# Altium PCB PCB.PcbDoc (part 10 of 10)
Units mm, origin at the board's own origin, x right, y up, seen from the top; angles counter-clockwise.
Board outline 100.5 x 147.95 mm, 6 copper layers (Top Layer, Layer 2 (GND), Layer 3, Layer 4, Layer 5 (AGND), Bottom Layer), stack 1.449 mm thick; 511 components, 297 nets, 1620 pads, 565 vias.
Unrouted connection lines stored in the file: 597.
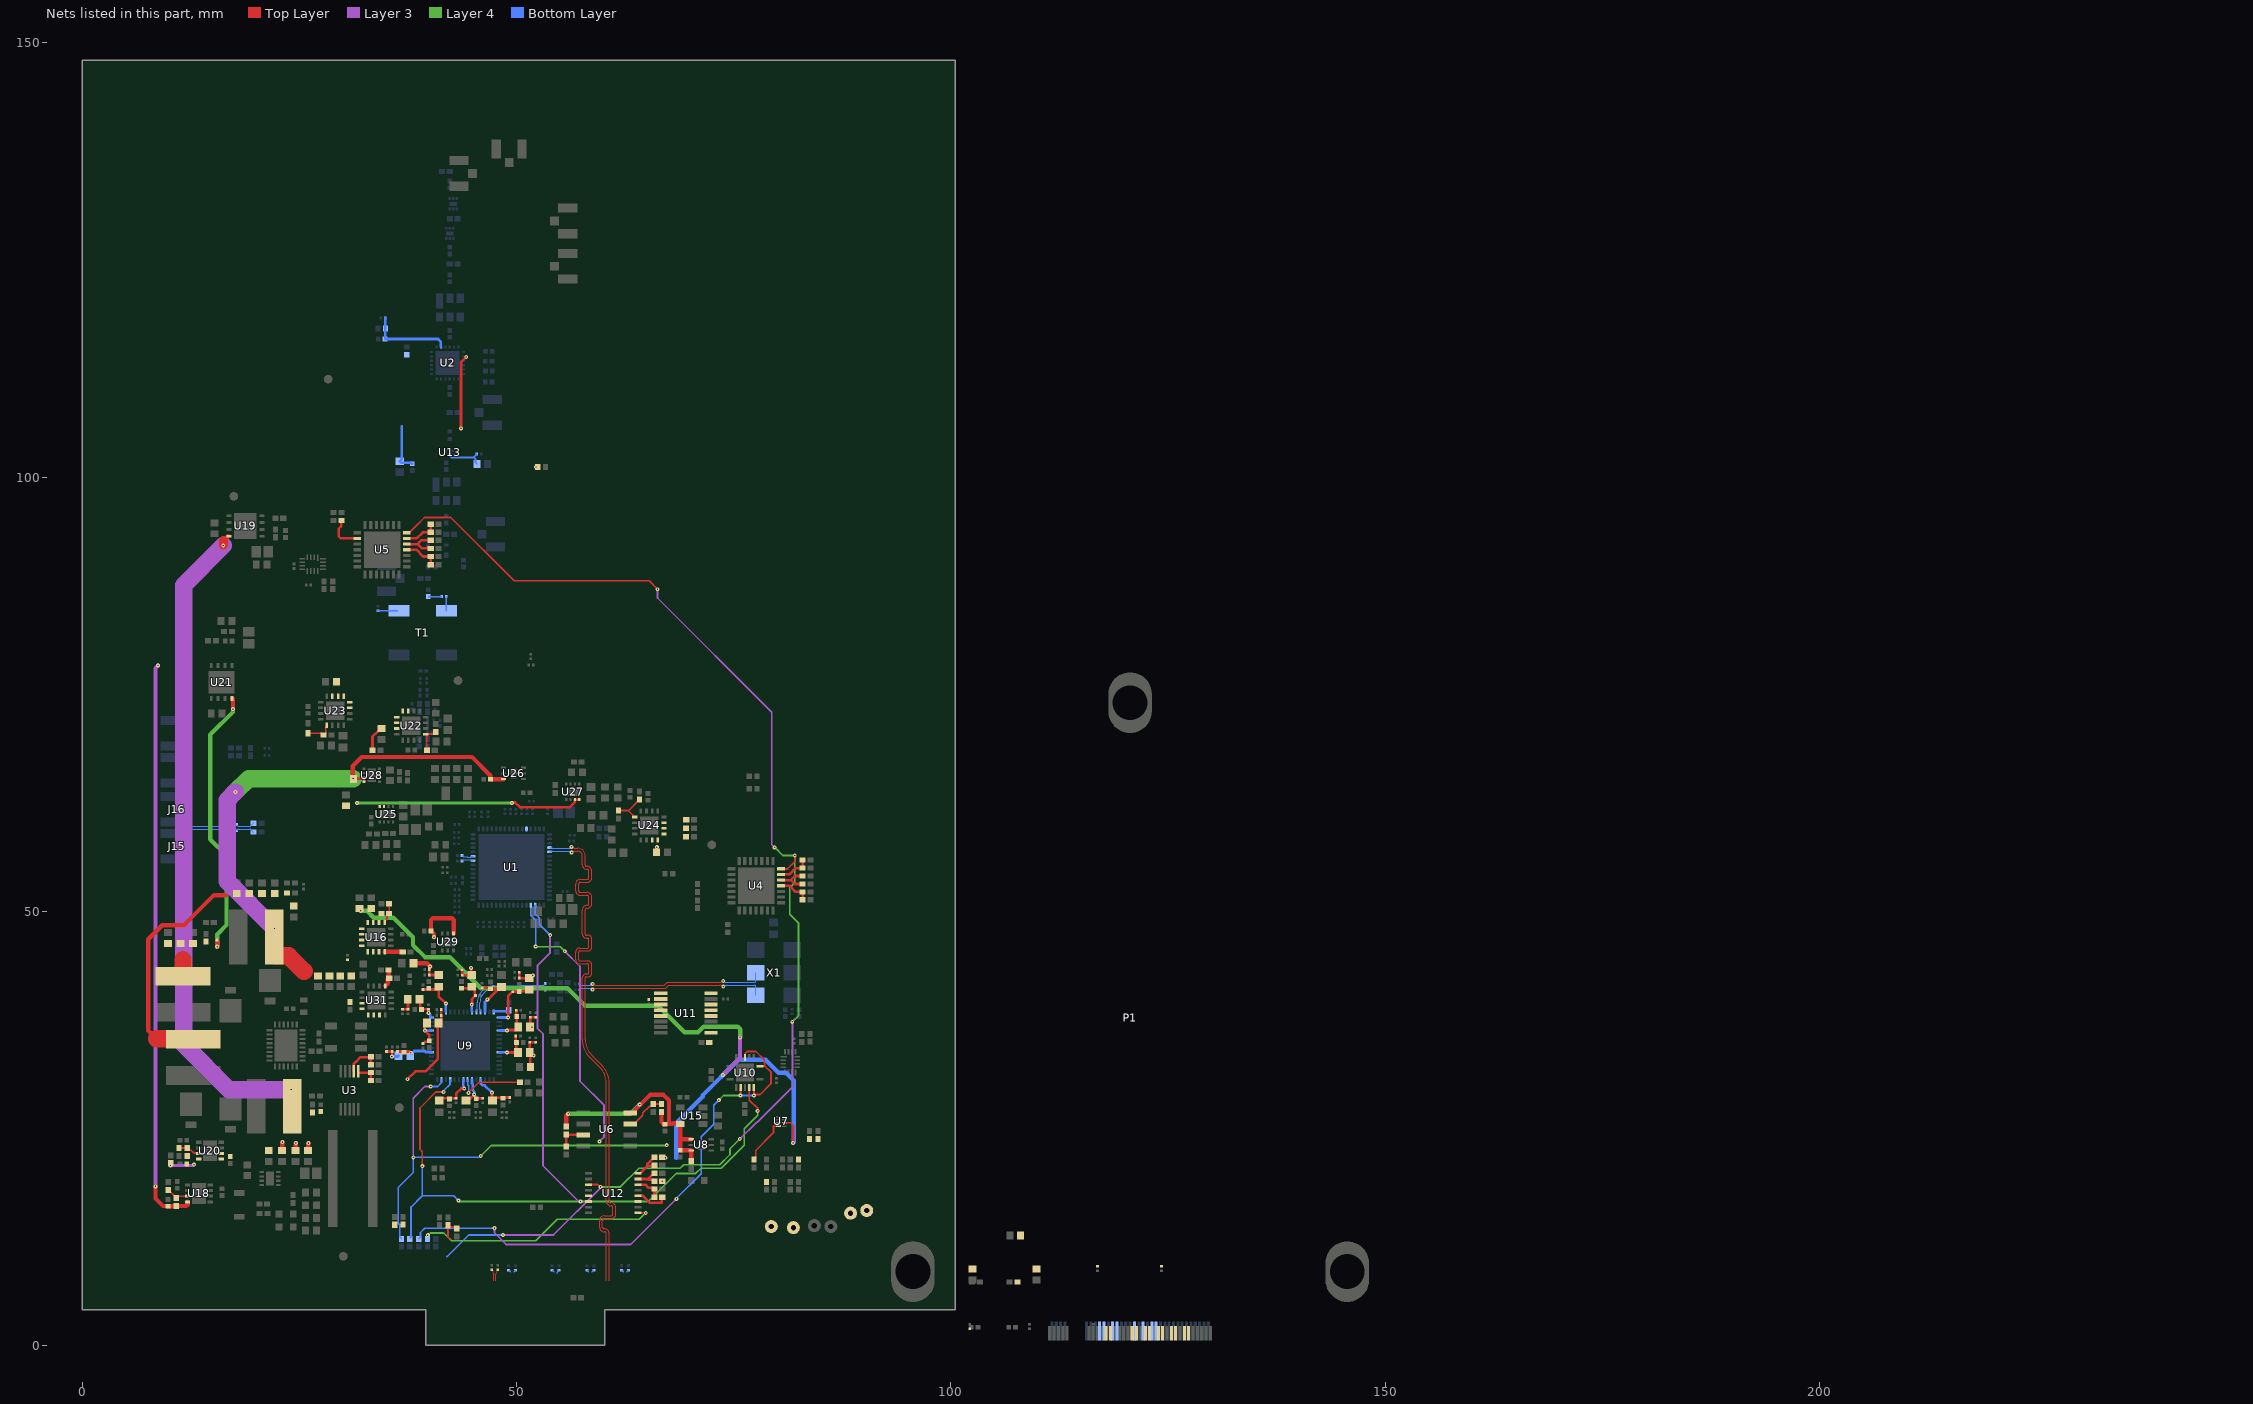
[diagram p7: the nets of this part, all layers, seen from the top]

## Via types
v1: diameter 0.45, hole 0.15, Top Layer to Bottom Layer, 432 vias
v2: diameter 0.5, hole 0.2, Top Layer to Bottom Layer, 132 vias
v3: diameter 0.6, hole 0.2, Top Layer to Bottom Layer, 1 vias

## Nets (pads, with @x,y where several pads share a name; then routed paths per layer and width w, separated by ;. In a path a pad name is that pad's centre, name@x,y a point inside that pad or via, vN(x,y) a via of type N, cw(c..) or ccw(c..) an arc to the next point about the centre after c; other vN are vias at no path point) (continued)
NetR16_1: R16.1 U7.7 U7.8 | length 5.7
  Top Layer w0.2: R16.1@77.316,21.446 77.516,21.646 77.516,22.487 79.562,24.534 79.562,25.325 U7.8@80.151,25.325 U7.7@80.151,25.625
NetR20_2: R20.2 R27.1 U6.7 | length 4.7
  Top Layer w0.2: U6.7@63.077,25.554 63.552,25.554 64.53,26.533 64.53,26.818 65.309,27.597 65.533,27.597 65.733,27.797 R20.2@65.733,27.847 R27.1@66.673,27.847
NetR21_1: R21.1 R119.2 U6.3 | length 3.4
  Top Layer w0.3: R119.2@55.7,22.944 R21.1@55.7,24.356 55.736,24.32 57.641,24.32 U6.3@57.677,24.284
NetR30_2: R30.2 U5.23 | length 4.3
  Top Layer w0.2: R30.2@29.836,95.037 R30.2@29.865,95.066
  Top Layer w0.3: R30.2@29.836,95.037 29.792,94.993 29.792,94.351 29.513,94.072 29.513,93.208 29.763,92.958 U5.23@31.659,92.958
NetR32_2: R32.2 U1.12
NetR50_1: R50.1 R51.2 U16.9 | length 2.4
  Top Layer w0.2: U16.9@34.807,48.726 34.807,48.876 35.08,49.148 35.08,49.574 35.28,49.774 R50.1@35.33,49.774 35.33,50.884 R51.2@35.322,50.892
NetR65_1: R65.1 R66.2 U22.9 | length 3.2
  Top Layer w0.2: R66.2@39.669,68.58 39.639,68.61 39.639,70.329 U22.9@39.539,70.429 40.453,70.429 R65.1@40.694,70.67
NetR67_1: R67.1 R68.2 U23.9 | length 3.2
  Top Layer w0.2: R68.2@25.987,70.518 25.99,70.516 27.59,70.516 R67.1@27.79,70.316 27.84,70.316 28.04,70.516 28.04,71.345 U23.9@28.141,71.446
NetR69_1: R69.1 R70.2 U24.9 | length 4
  Top Layer w0.2: R69.1@61.72,61.629 62.856,61.629 ; U24.9@63.601,60.884 62.856,61.629 ; R70.2@64.133,62.906 64.133,62.856 62.906,61.629 62.856,61.629
NetR77_2: R77.2 U9.42 | length 1.8
  Bottom Layer w0.3: U9.42@47.361,38.452 47.361,38.515 47.391,38.545 49.004,38.545 R77.2@49.096,38.638
NetR78_2: R78.2 U9.7 | length 8
  Top Layer w0.2: v1(44.448,29.124) 45.667,30.343 R78.2@50.366,30.343
  Bottom Layer w0.2: U9.7@44.361,30.652 44.381,30.632 44.381,30.056 44.491,29.946 44.491,29.166 v1(44.448,29.124)
NetR80_1: R80.1 R81.2 U18.7 | length 2.7
  Top Layer w0.2: R81.2@9.884,17.957 9.918,17.957 10.825,17.05 R80.1@10.825,17.034 ; R80.1@10.825,17 R80.1@10.825,17.034 ; U18.7@12.125,17.234 11.025,17.234 R80.1@10.825,17.034
NetR82_1: R82.1 R85.2 U20.7 | length 2.6
  Top Layer w0.2: R85.2@11.137,22.78 R82.1@12.083,22.781 12.083,22.731 12.283,22.531 12.507,22.531 12.82,22.217 13.324,22.217 U20.7@13.399,22.142
NetR86_1: R86.1 R88.2 U31.9 | length 2.1
  Top Layer w0.5: U31.9@34.857,41.441 34.907,41.441 35.179,41.713 35.179,42.282 35.229,42.332 35.279,42.332 35.275,42.335 35.275,43.268 R86.1@35.272,43.272
NetR111_2: R111.2 R129.1 U3.2 | length 4.1
  Top Layer w0.3: U3.2@31.27,31.628 31.27,32.498 31.475,32.703 31.492,32.703 32.028,33.239 33.16,33.239 R129.1@33.21,33.289 R111.2@33.21,32.375
NetR112_2: R112.2 R130.1 U3.1 | length 2.5
  Top Layer w0.3: U3.1@31.77,31.628 31.77,31.461 R130.1@33.21,31.461 R112.2@33.21,30.546
NetR113_1: R113.1 R118.2 U4.12 | length 4.3
  Top Layer w0.3: U4.12@80.42,53.624 81.559,53.624 ; R118.2@82.929,53.178 82.005,53.178 81.559,53.624 ; R113.1@82.929,54.092 82.026,54.092 81.559,53.624
NetR114_1: R114.1 R116.2 U4.13 | length 3.7
  Top Layer w0.3: U4.13@80.42,54.274 81.416,54.274 82.129,54.988 82.91,54.988 R116.2@82.929,55.006 R114.1@82.929,55.921
NetR115_1: R115.1 R117.2 U4.11 | length 3.7
  Top Layer w0.3: U4.11@80.42,52.974 81.426,52.974 82.129,52.272 82.921,52.272 R115.1@82.929,52.263 R117.2@82.929,51.349
NetR120_2: R120.2 R123.1 U5.11 | length 4
  Top Layer w0.3: U5.11@37.359,91.658 38.45,91.658 39.236,90.871 R120.2@40.112,90.871 R123.1@40.112,89.931
NetR121_2: R121.2 R125.1 U5.12 | length 4.7
  Top Layer w0.3: U5.12@37.359,92.308 38.594,92.308 ; R125.1@40.112,91.811 39.091,91.811 38.594,92.308 ; R121.2@40.112,92.751 39.037,92.751 38.594,92.308
NetR122_2: R122.2 R124.1 U5.13 | length 4
  Top Layer w0.3: U5.13@37.359,92.958 38.489,92.958 39.197,93.665 R124.1@40.112,93.665 R122.2@40.112,94.58
NetR138_1: R138.1 R143.2 U12.14 | length 3.1
  Top Layer w0.3: U12.14@63.961,18.567 64.811,18.567 65.178,18.199 65.718,18.199 R143.2@65.868,18.049 R138.1@65.868,17.11
NetR139_1: R139.1 R142.2 U12.15 | length 3.1
  Top Layer w0.3: U12.15@63.961,19.217 65.074,19.217 65.177,19.114 ; R142.2@65.86,19.878 65.81,19.878 65.177,19.245 65.177,19.114 ; R139.1@65.868,18.964 65.718,19.114 65.177,19.114
NetR140_1: R140.1 R141.2 U12.16 | length 3.6
  Top Layer w0.3: U12.16@63.961,19.867 64.211,19.867 65.068,20.724 ; R141.2@65.868,20.793 65.799,20.724 65.068,20.724 ; R140.1@65.868,21.707 65.818,21.707 65.068,20.957 65.068,20.724
NetR145_1: R145.1 U11.9
O1_N: C185.2 U1.59 | length 1.4
  Bottom Layer w0.112: C185.2@43.712,56.454 43.712,56.444 43.863,56.293 44.315,56.293 44.33,56.278 44.693,56.278 44.787,56.372 U1.59@44.987,56.372
O1_P: C183.2 U1.58 | length 1.4
  Bottom Layer w0.112: C183.2@43.712,55.819 43.712,55.829 43.863,55.981 44.186,55.981 44.201,55.966 44.693,55.966 44.787,55.872 U1.58@44.987,55.872
O2_N: C187.2 P1.52 | length 1.3
  Top Layer w0.112: 47.603,7.474 47.603,8.232 cw(c48.331,8.232) 47.816,8.747 C187.2@47.826,8.747
O2_P: C186.2 P1.50 | length 1.3
  Top Layer w0.112: C186.2@47.141,8.747 47.151,8.747 cw(c46.636,8.232) 47.364,8.232 47.364,7.474
O5_N: C228.1 R98.2 | length 2.2
  Bottom Layer w0.112: C228.1@17.79,60.01 17.87,59.931 cw(c17.836,59.897) 17.884,59.897 ccw(c17.932,59.897) 17.898,59.863 ccw(c18.023,59.988) 18.023,59.811 19.302,59.811 ccw(c19.302,59.923) 19.382,59.844 19.4,59.862 ccw(c19.364,59.898) 19.415,59.898 cw(c19.466,59.898) 19.43,59.934 19.623,60.127 cw(c19.709,60.042) R98.2@19.709,60.163
O5_P: C227.1 R97.2 | length 2.2
  Bottom Layer w0.112: C227.1@17.79,59.299 17.87,59.379 ccw(c17.836,59.413) 17.884,59.413 cw(c17.932,59.413) 17.898,59.447 cw(c18.023,59.321) 18.023,59.498 19.302,59.498 cw(c19.302,59.386) 19.382,59.465 19.4,59.447 cw(c19.364,59.411) 19.415,59.411 ccw(c19.466,59.411) 19.43,59.376 19.623,59.182 ccw(c19.709,59.267) R97.2@19.709,59.147
O5P_N: C228.2 J16.2 | length 7.7
  Bottom Layer w0.112: J16.2@11.631,61.788 11.631,59.923 ccw(c11.744,59.923) 11.664,59.844 ccw(c11.744,59.923) 11.744,59.811 17.064,59.811 ccw(c17.064,59.923) 17.144,59.844 17.162,59.863 ccw(c17.129,59.897) 17.177,59.897 cw(c17.224,59.897) 17.191,59.931 C228.2@17.27,60.01
O5P_P: C227.2 J15.2 | length 7.7
  Bottom Layer w0.112: J15.2@11.631,57.521 11.631,59.386 cw(c11.744,59.386) 11.664,59.465 cw(c11.744,59.386) 11.744,59.498 17.064,59.498 cw(c17.064,59.386) 17.144,59.465 17.162,59.447 cw(c17.129,59.413) 17.177,59.413 ccw(c17.224,59.413) 17.191,59.379 C227.2@17.27,59.299
OSCIN_N: C179.2 U9.38 | length 10.1
  Bottom Layer w0.112: U9.38@45.361,38.452 45.361,38.566 cw(c45.521,38.566) 45.408,38.679 ccw(c45.295,38.793) 45.455,38.793 45.455,39.051 45.457,39.052 45.457,39.487 cw(c47.445,39.487) 47.445,41.476 50.515,41.476 cw(c50.554,41.437) 50.554,41.492 53.086,41.492 ccw(c53.086,41.605) 53.165,41.525 53.18,41.539 ccw(c53.135,41.584) 53.198,41.584 cw(c53.262,41.584) 53.217,41.629 C179.2@53.292,41.704
OSCIN_P: C176.2 U9.39 | length 9.7
  Bottom Layer w0.112: U9.39@45.861,38.452 45.861,38.566 ccw(c45.701,38.566) 45.814,38.679 cw(c45.927,38.793) 45.767,38.793 45.767,38.921 45.769,38.923 45.769,39.487 cw(c47.445,39.487) 47.445,41.163 50.663,41.163 cw(c50.702,41.124) 50.702,41.18 53.086,41.18 cw(c53.086,41.067) 53.165,41.147 53.18,41.132 cw(c53.135,41.087) 53.198,41.087 ccw(c53.262,41.087) 53.217,41.043 C176.2@53.292,40.968
PER0_N: C235.2 P1.47 | length 0.3
  Bottom Layer w0.138: 49.646,8.503 cw(c49.784,8.503) 49.687,8.6 49.7,8.614 cw(c49.765,8.549) 49.765,8.64 ccw(c49.765,8.732) C235.2@49.829,8.667 ; C235.2@49.829,8.667 C235.2@49.884,8.722
PER0_P: C236.2 P1.49 | length 0.3
  Bottom Layer w0.138: C236.2@49.071,8.722 49.125,8.667 ccw(c49.19,8.732) 49.19,8.64 cw(c49.19,8.549) 49.255,8.614 49.268,8.6 cw(c49.171,8.503) 49.309,8.503
PER1_N: C233.2 P1.35 | length 0.6
  Bottom Layer w0.138: 54.652,8.282 54.65,8.284 54.65,8.503 cw(c54.788,8.503) 54.69,8.6 54.704,8.614 cw(c54.769,8.549) 54.769,8.64 ccw(c54.769,8.732) C233.2@54.833,8.667 ; C233.2@54.833,8.667 C233.2@54.888,8.722
PER1_P: C234.2 P1.37 | length 0.3
  Bottom Layer w0.138: C234.2@54.075,8.722 54.129,8.667 ccw(c54.194,8.732) 54.194,8.64 cw(c54.194,8.549) 54.259,8.614 54.272,8.6 cw(c54.175,8.503) 54.312,8.503
PER2_N: C17.2 P1.25 | length 0.4
  Bottom Layer w0.138: 58.663,8.484 cw(c58.847,8.484) 58.717,8.614 cw(c58.782,8.549) 58.782,8.64 ccw(c58.782,8.732) C17.2@58.846,8.667 ; C17.2@58.846,8.667 C17.2@58.901,8.722
PER2_P: C18.2 P1.23 | length 0.4
  Bottom Layer w0.138: C18.2@58.088,8.722 58.142,8.667 ccw(c58.207,8.732) 58.207,8.64 cw(c58.207,8.549) 58.272,8.614 cw(c58.142,8.484) 58.326,8.484
PER3_N: C15.2 P1.13 | length 0.4
  Bottom Layer w0.138: 62.651,8.49 cw(c62.835,8.49) 62.705,8.62 cw(c62.77,8.555) 62.77,8.646 ccw(c62.77,8.738) 62.834,8.673 C15.2@62.889,8.728
PER3_P: C16.2 P1.11 | length 0.4
  Bottom Layer w0.138: C16.2@62.076,8.728 62.13,8.673 ccw(c62.195,8.738) 62.195,8.646 cw(c62.195,8.555) 62.26,8.62 cw(c62.13,8.49) 62.313,8.49
PERST#: P1.32 U4.14 U5.14 U12.3 | length 151.1
  Top Layer w0.2: U5.14@37.359,93.608 37.624,93.608 38.454,94.438 38.465,94.438 39.394,95.367 42.416,95.367 49.706,88.077 65.251,88.077 v1(66.216,87.112) ; U12.3@58.261,18.567 59.331,18.567 59.595,18.303 v1(59.663,18.303) ; U4.14@80.42,54.924 80.442,54.902 81.174,54.902 82.015,55.743 v1(82.015,56.454)
  Layer 3 w0.2: v1(48.436,12.766) 54.233,12.766 59.615,18.148 59.615,18.256 v1(59.663,18.303) ; v1(66.216,87.112) 66.216,86.096 79.373,72.939 79.373,57.724 v1(79.703,57.394) ; v1(75.69,23.815) 77.629,25.754 77.711,25.754 81.752,29.795 81.752,37.286 v1(81.735,37.303)
  Layer 4 w0.2: v1(59.663,18.303) 61.949,18.303 64.082,20.437 68.814,20.437 69.237,20.86 73.402,20.86 74.569,22.027 74.569,22.694 v1(75.69,23.815) ; v1(79.703,57.394) 80.643,56.454 v1(82.015,56.454) 82.015,53.316 81.439,52.74 81.439,49.67 82.464,48.645 82.464,38.031 v1(81.735,37.303)
  Bottom Layer w0.2: 41.983,10.276 44.474,12.766 v1(48.436,12.766)
PET1_N: P1.29
PET1_P: P1.31
PET2_N: P1.19
PET2_P: P1.17
PET3_N: P1.46 U1.20 | length 63.6
  Top Layer w0.138: v1(56.335,57.447) cw(c56.335,57.252) 56.473,57.39 ccw(c56.713,57.63) 56.713,57.291 57.047,57.291 cw(c57.047,56.445) 57.892,56.445 57.892,55.396 ccw(c58.096,55.396) 58.096,55.192 ; 58.096,50.381 ccw(c58.096,50.177) 57.892,50.177 57.892,47.422 ccw(c58.022,47.422) 58.022,47.292 58.193,47.292 cw(c58.193,46.825) 58.66,46.825 58.66,45.931 cw(c58.193,45.931) 58.193,45.464 57.253,45.464 ccw(c57.253,45.334) 57.124,45.334 57.124,44.439 ccw(c57.253,44.439) 57.253,44.31 58.193,44.31 cw(c58.193,43.843) 58.66,43.843 58.66,42.948 cw(c58.193,42.948) 58.193,42.481 58.022,42.481 ccw(c58.022,42.352) 57.892,42.352 57.892,35.274 ccw(c60.432,35.274) 58.636,33.478 59.812,32.302 cw(c57.784,30.274) 60.652,30.274 60.652,16.661 ccw(c60.856,16.661) 60.856,16.457 ; 58.119,50.381 ccw(c58.119,50.922) 58.66,50.922 58.66,51.668 ccw(c58.119,51.668) 58.119,52.209 57.328,52.209 cw(c57.328,52.413) 57.124,52.413 57.124,53.159 cw(c57.328,53.159) 57.328,53.363 58.119,53.363 ccw(c58.119,53.905) 58.66,53.905 58.66,54.65 ccw(c58.119,54.65) 58.119,55.192 ; 60.088,13.474 cw(c60.088,13.678) 59.884,13.678 59.884,14.424 cw(c60.088,14.424) 60.088,14.628 60.879,14.628 ccw(c60.879,15.17) 61.42,15.17 61.42,15.915 ccw(c60.879,15.915) 60.879,16.457 ; 60.11,13.474 cw(c60.11,12.933) 60.652,12.933 60.652,7.507
  Bottom Layer w0.138: U1.20@53.787,57.372 53.924,57.372 cw(c53.924,57.233) 54.022,57.331 ccw(c54.12,57.429) 54.12,57.291 56.292,57.291 ccw(c56.292,57.334) 56.323,57.304 ccw(c56.292,57.334) 56.335,57.334 v1(56.335,57.447)
PET3_P: P1.44 U1.21 | length 63
  Top Layer w0.138: v1(56.335,56.797) ccw(c56.335,56.992) 56.473,56.854 cw(c56.713,56.614) 56.713,56.953 57.047,56.953 cw(c57.047,56.445) 57.555,56.445 57.555,55.396 ccw(c58.096,55.396) 58.096,54.854 ; 58.096,50.718 ccw(c58.096,50.177) 57.555,50.177 57.555,47.422 ccw(c58.022,47.422) 58.022,46.955 58.193,46.955 cw(c58.193,46.825) 58.323,46.825 58.323,45.931 cw(c58.193,45.931) 58.193,45.801 57.253,45.801 ccw(c57.253,45.334) 56.786,45.334 56.786,44.439 ccw(c57.253,44.439) 57.253,43.972 58.193,43.972 cw(c58.193,43.843) 58.323,43.843 58.323,42.948 cw(c58.193,42.948) 58.193,42.819 58.022,42.819 ccw(c58.022,42.352) 57.555,42.352 57.555,35.273 ccw(c60.429,35.273) 58.397,33.24 59.571,32.066 cw(c57.774,30.27) 60.314,30.27 60.314,16.661 ccw(c60.856,16.661) 60.856,16.119 ; 58.119,50.718 ccw(c58.119,50.922) 58.323,50.922 58.323,51.668 ccw(c58.119,51.668) 58.119,51.872 57.328,51.872 cw(c57.328,52.413) 56.786,52.413 56.786,53.159 cw(c57.328,53.159) 57.328,53.701 58.119,53.701 ccw(c58.119,53.905) 58.323,53.905 58.323,54.65 ccw(c58.119,54.65) 58.119,54.854 ; 60.088,13.137 cw(c60.088,13.678) 59.546,13.678 59.546,14.424 cw(c60.088,14.424) 60.088,14.966 60.879,14.966 ccw(c60.879,15.17) 61.083,15.17 61.083,15.915 ccw(c60.879,15.915) 60.879,16.119 ; 60.11,13.137 cw(c60.11,12.933) 60.314,12.933 60.314,7.507
  Bottom Layer w0.138: U1.21@53.787,56.872 53.924,56.872 ccw(c53.924,57.011) 54.022,56.913 cw(c54.12,56.815) 54.12,56.953 56.292,56.953 cw(c56.292,56.91) 56.323,56.941 cw(c56.292,56.91) 56.335,56.91 v1(56.335,56.797)
SC18_INT: R28.1 R105.2 U12.9 | length 27.8
  Top Layer w0.2: U12.9@63.961,15.317 63.966,15.312 64.864,15.312 v1(64.87,15.306)
  Layer 4 w0.2: v1(39.775,12.741) 39.797,12.741 40.051,12.995 41.623,12.995 42.529,12.089 52.194,12.089 54.675,14.57 63.879,14.57 64.133,14.57 v1(64.87,15.306)
SMCLK: P1.26 R47.1
SMDAT: P1.28 R45.1 | length 0.2
  Top Layer w0.2: R45.1@36.904,13.953 R45.1@37.04,13.817
SPI_CLK: R36.2 U1.36 U9.13 U11.14 | length 83.4
  Layer 3 w0.2: v1(38.098,21.707) 38.098,28.52 39.439,29.86 v1(40.105,29.86) ; v1(55.548,45.431) 57.301,43.678 57.301,30.46 60.069,27.692 60.069,24.069 v1(59.536,23.536)
  Layer 4 w0.2: v1(45.871,21.859) 47.073,23.062 67.24,23.062 v1(67.283,23.104) ; v1(52.195,45.989) 52.225,45.96 55.019,45.96 v1(55.548,45.431)
  Bottom Layer w0.2: R36.2@36.752,12.327 36.552,12.527 36.552,13.926 36.379,14.099 36.379,18.236 38.098,19.954 v1(38.098,21.707) 45.651,21.707 45.803,21.859 v1(45.871,21.859) ; v1(40.105,29.86) 40.913,29.86 41.341,30.288 41.341,30.632 U9.13@41.361,30.652 ; 51.618,50.392 51.618,49.578 52.195,49.001 v1(52.195,45.989)
SPI_CLK_SCI: TP4.1 U11.3 U12.11
SPI_MISO: R104.2 TP3.1 U10.3 U10.6 U10.8 U10.11 U11.12 | length 62.5
  Top Layer w0.2: v1(75.766,28.819) 75.779,28.832 75.779,29.722 U10.3@75.792,29.735 ; U10.11@76.292,33.185 76.332,33.225 76.332,33.689 76.527,33.885 77.556,33.885 78.52,32.921 78.52,32.597 78.57,32.546 78.57,32.223 ; U10.6@77.292,29.735 77.332,29.695 77.332,29.057 v1@77.443,28.946 ; v1(77.316,28.819) v1@77.443,28.946 ; U10.8@78.017,32.21 78.029,32.223 78.57,32.223 ; v1@77.443,28.946 78.027,28.946 79.297,30.216 79.297,31.496 78.57,32.223
  Layer 3 w0.2: v1(47.445,13.554) 47.445,13.014 48.786,11.674 63.143,11.674 v1(68.4,16.932)
  Layer 4 w0.2: v1(73.277,28.286) 73.811,28.819 v1(75.766,28.819)
  Bottom Layer w0.2: R104.2@38.733,12.327 38.933,12.527 38.933,13.053 39.434,13.554 v1(47.445,13.554) ; v1(68.4,16.932) 68.4,16.983 71.245,19.827 71.245,24.069 72.693,25.517 72.693,27.701 v1(73.277,28.286) ; v1(75.766,28.819) v1(77.316,28.819)
SPI_MISO_SCI: TP6.1 U11.5 U12.5
SPI_MOSI: R48.2 U1.35 U9.11 U10.5 U11.13 | length 106.3
  Top Layer w0.2: v1(39.14,20.691) 39.14,22.362 38.869,22.633 38.869,27.384 40.71,29.225 v1(41.603,29.225) ; v1(57.351,16.627) v1@57.356,16.622 ; U10.5@76.791,29.734 76.791,28.296 77.748,27.339 v1(77.748,27.041)
  Layer 3 w0.2: v1(53.872,47.285) 53.855,47.268 53.855,45.237 52.39,43.773 52.39,36.577 53.042,35.925 53.042,20.728 57.142,16.627 v1(57.351,16.627)
  Layer 4 w0.2: v1(43.305,16.729) 43.407,16.627 v1(57.351,16.627) 65.173,16.627 68.399,19.853 70.629,19.853 71.231,20.454 73.561,20.454 76.215,23.108 76.215,25.001 77.748,26.533 v1(77.748,27.041)
  Bottom Layer w0.2: R48.2@37.692,12.377 37.853,12.538 37.853,15.991 39.14,17.278 ; v1(39.14,20.691) 39.14,17.278 ; v1(41.603,29.225) 41.603,29.403 42.341,30.141 42.341,30.632 U9.11@42.361,30.652 ; v1(43.305,16.729) 42.756,17.278 39.14,17.278 ; U1.35@52.137,50.722 52.118,50.703 52.118,50.211 52.102,50.195 52.102,49.76 52.595,49.267 52.595,48.561 v1(53.872,47.285)
SPI_MOSI_SCI: TP5.1 U11.4 U12.6
Tor_RF_50: C19.1 C32.1 | length 1.6
  Bottom Layer w0.165: C32.1@39.808,86.271 C19.1@41.388,86.271
TorRF_50: C19.2 T1.1 | length 1.6
  Bottom Layer w0.165: T1.1@41.908,84.632 C19.2@41.908,86.271
TorRF_50_1: C20.2 T1.4 | length 2.4
  Bottom Layer w0.165: C20.2@33.956,84.632 T1.4@36.337,84.632
V2.5: C45.2 C46.2 C47.2 C48.2 C55.2 C112.2 C131.2 L3.2 R52.2 U25.7 U25.8 U27.7 U27.8 | length 53.5
  Top Layer w0.3: v1(49.477,62.499) 49.528,62.55 49.833,62.55 50.366,62.017 56.129,62.017 56.687,62.575 56.687,62.87 U27.7@56.712,62.895 U27.8@57.212,62.895
  Top Layer w0.5: 8.54,35.36 7.597,36.303 7.597,46.803 9.21,48.416 11.692,48.416 12.351,49.075 15.17,51.894 16.517,51.894
  Top Layer w2: 8.54,35.36 12.694,35.36 L3.2@12.769,35.285
  Layer 4 w0.3: v1(31.621,62.499) v1(49.477,62.499)
V3.6: C38.2 R102.2 U16.1 U16.2 U16.3 U16.4 U16.15 U16.16 | length 2.1
  Top Layer w0.5: U16.4@34.807,45.376 34.818,45.365 36.875,45.365 R102.2@36.886,45.354
V3.7: C51.2 C52.2 C53.2 C94.2 C147.2 C168.2 C245.2 L5.2 R?.2@107.655,7.35 U26.6 U28.7 U28.8 U29.1 | length 67.7
  Top Layer w0.3: C147.2@31.228,65.279 32.267,65.279 ; U28.8@32.433,64.945 32.433,65.279 32.267,65.279 ; U28.7@32.433,65.445 32.267,65.279
  Top Layer w0.5: C147.2@31.228,65.279 31.139,65.369 31.139,66.767 32.167,67.795 44.852,67.795 46.972,65.675 46.972,65.269 46.992,65.249 C94.2@46.997,65.249 U26.6@48.494,65.249 ; v1(40.486,47.056) 40.486,47.403 40.13,47.758 C168.2@40.139,47.767 40.139,49.021 40.333,49.215 42.579,49.215 42.761,49.033 42.761,47.497 U29.1@42.736,47.472
  Top Layer w2: L5.2@22.105,47.067 22.105,44.992 22.18,44.917 23.756,44.917 24.075,44.598 24.075,44.561 25.492,43.144 25.529,43.144
  Layer 3 w2: v1(17.626,63.769) 16.686,62.83 16.686,53.481 v1(22.126,48.041)
  Layer 4 w2: v1(17.626,63.769) 19.165,65.309 v1(31.198,65.309)
V5.5: C61.2 C62.2 C63.2 C64.2 C65.2 C69.2 C247.2 L7.2 R59.1 U19.4 U20.1 U20.2 | length 78
  Top Layer w0.3: v1(16.229,92.141) v1@16.258,92.17 ; U19.4@16.726,93.191 U19.4@16.876,93.191
  Top Layer w0.5: 16.258,92.723 U19.4@16.726,93.191 ; C64.2@22.976,22.494 23.036,22.554 v1(23.036,23.46) ; C63.2@24.539,22.494 24.585,22.541 v1(24.585,23.358) ; C62.2@25.979,22.494 26.008,22.523 26.008,23.307 v1(26.033,23.333)
  Top Layer w1: v1@16.258,92.17 16.258,92.723
  Layer 3 w2: v1(16.229,92.141) 11.657,87.569 11.657,34.737 16.889,29.505 v1(24.052,29.505)
V_LMK_1.8V: C158.2 C159.2 C162.2 C163.2 C181.2 C182.2 C191.2 C192.2 C199.2 C200.2 C203.2 C204.2 C211.2 C212.2 C215.2 C216.2 C220.2 FB17.1 FB18.1 FB20.1 FB22.1 FB24.1 FB25.1 FB27.1 FB28.1 FB30.2 | length 28.4
  Top Layer w0.3: C181.2@35.025,33.893 C182.2@35.675,33.893 ; v1(35.634,33.315) 35.663,33.344 35.663,33.871 35.675,33.883 C182.2@35.675,33.893 ; C182.2@35.685,33.893 C182.2@35.675,33.893 ; C211.2@36.854,38.75 36.864,38.75 36.87,38.756 C212.2@37.489,38.756 37.489,39.879 FB27.1@37.474,39.893 37.387,39.98 37.514,40.107 FB27.1@37.514,40.097 ; v1(37.438,30.699) 38.34,31.6 39.533,31.6 40.911,32.978 40.911,37.064 FB24.1@41.023,37.176 41.323,37.476 41.323,38.016 41.336,38.029 C200.2@41.336,38.039 C199.2@41.336,38.725 ; v1@40.054,43.663 39.96,43.569 C159.2@39.96,43.339 C158.2@39.96,42.703 FB17.1@41.032,42.703 ; C216.2@43.735,43.311 C215.2@43.735,42.663 44.785,42.663 FB28.1@44.825,42.703 44.753,42.774 v1(44.753,43.526) ; C163.2@50.299,43.018 C162.2@50.299,42.343 FB18.1@51.471,42.343 ; FB22.1@51.539,36.718 51.56,36.74 C192.2@51.56,37.855 52.166,37.855 52.185,37.836 C191.2@52.195,37.836 ; C220.2@51.586,32.121 51.586,33.71 FB25.1@51.518,33.778 C203.2@51.518,34.934 C204.2@52.193,34.934
  Top Layer w0.5: FB30.2@38.124,44.059 39.667,44.059 40.04,43.686 40.04,43.677 v1@40.054,43.663
  Bottom Layer w0.3: v1(35.634,33.315) 36.295,33.315 FB20.1@36.396,33.416
  other v1: 51.967,33.442 51.763,36.693 51.865,42.662 40.029,43.678
VCC: C34.2 C50.2 C237.2 R21.2 R27.2 R132.2 U6.8 U8.4 U8.6 U15.5 | length 28.6
  Top Layer w0.5: R21.2@55.7,25.256 55.7,26.482 v1(55.929,26.711) ; U6.8@63.077,26.824 63.282,26.824 65.352,28.895 66.911,28.895 67.536,28.27 67.536,25.72 ; R27.2@66.623,26.897 R27.2@66.673,26.947 66.673,25.771 C34.2@66.918,25.526 ; C34.2@67.08,25.526 67.08,25.531 67.1,25.551 67.886,25.551 67.969,25.634 68.735,25.634 U15.5@68.841,25.527 ; U15.5@68.848,25.534 U15.5@68.841,25.527 ; U8.4@70.095,23.779 70.087,23.788 69.045,23.788 68.84,23.993 ; R132.2@70.102,21.293 70.102,22.472 U8.6@70.095,22.479 70.071,22.504 68.852,22.504 68.832,22.524 C237.2@68.832,22.529 68.84,22.537 68.84,23.993 ; 68.84,23.993 68.84,25.526 U15.5@68.841,25.527
  Layer 4 w0.5: v1(55.929,26.711) 63.092,26.711 v1(64.159,27.778)
VCC_2.8_LNA: C26.2 C27.2 FB1.2 U13.2 | length 4.5
  Bottom Layer w0.2: U13.2@42.3,102.659 42.325,102.634 42.325,102.431 42.472,102.284 45.051,102.284 ; C26.2@45.412,101.52 45.272,101.66 45.272,102.063 45.051,102.284 ; C27.2@45.418,102.662 45.418,102.652 45.051,102.284
  other v1: 52.233,101.183
VCC_5_ATT: C9.2 C10.2 FB2.2 U2.2 | length 9.6
  Bottom Layer w0.3: C9.2@34.856,118.336 34.856,115.913 C10.2@34.858,115.911 40.954,115.911 41.275,115.59 41.275,115.005 U2.2@41.3,114.98
VCC_AMP_5: C30.2 FB3.2 R46.2 | length 14.1
  Top Layer w0.3: v1(43.597,105.628) 43.597,113.247 v1(44.2,113.85)
  Bottom Layer w0.3: 36.763,105.878 36.763,102.062 R46.2@36.556,101.855 36.741,101.669 37.853,101.669 37.973,101.549 C30.2@37.973,101.544
VCC_PCA: C35.2 C36.2 C243.1 C251.1 R19.2 R50.2 R126.2 R138.2 R139.2 R140.2 U7.2 U11.1 U11.2 U11.16 U12.12 U16.10 U16.11 U16.12 U16.13 U16.14 | length 92.3
  Top Layer w0.2: U7.2@80.821,25.675 81.552,25.675 81.913,25.314
  Top Layer w0.3: U12.12@63.961,17.267 64.565,17.267 65.373,16.46 66.726,16.46 66.726,17.068 R138.2@66.768,17.11 ; v1(81.837,23.358) 81.837,25.238
  Layer 3 w0.5: v1(73.76,31.181) 75.716,33.137 v1(75.716,35.525)
  Layer 4 w0.5: v1(32.053,50.079) 32.764,50.079 33.552,49.291 35.812,49.291 38.073,47.031 38.073,46.127 39.444,44.756 42.289,44.756 45.881,41.163 55.853,41.163 57.86,39.156 66.278,39.156 69.34,36.094 70.888,36.094 71.552,36.758 75.448,36.758 75.741,36.466 75.741,35.55 v1(75.716,35.525)
  Bottom Layer w0.5: 68.375,21.631 68.375,25.633 71.412,28.671 71.412,28.834 75.512,32.934 78.662,32.934 80.148,31.448 81.001,31.448 81.902,30.546 81.902,23.423 v1(81.837,23.358)
  other v1: 66.768,18.964 67.13,21.656
VCXO_OUT_N: C178.1 X1.5 | length 21.8
  Top Layer w0.138: v1(58.748,41.657) 58.829,41.657 58.985,41.501 67.003,41.501 67.347,41.845 73.408,41.845 ccw(c73.408,42.184) 73.648,41.944 cw(c73.785,41.806) v1(73.785,42.001)
  Bottom Layer w0.138: C178.1@57.283,41.67 57.283,41.66 57.435,41.508 57.881,41.508 57.888,41.501 58.512,41.501 58.668,41.657 v1(58.748,41.657) ; v1(73.785,42.001) cw(c73.785,41.806) 73.923,41.944 73.944,41.923 ccw(c74.133,42.111) 74.133,41.845 77.398,41.845 ccw(c77.398,41.982) 77.495,41.885 ccw(c77.398,41.982) 77.535,41.982 X1.5@77.535,42.976
VCXO_OUT_P: C175.1 X1.4 | length 21.8
  Top Layer w0.138: v1(58.748,41.007) 58.829,41.007 58.985,41.163 67.143,41.163 67.487,41.507 73.408,41.507 cw(c73.408,41.168) 73.648,41.408 ccw(c73.785,41.546) v1(73.785,41.351)
  Bottom Layer w0.138: C175.1@57.283,41.008 57.283,41.018 57.435,41.17 57.741,41.17 57.748,41.163 58.512,41.163 58.668,41.007 v1(58.748,41.007) ; v1(73.785,41.351) ccw(c73.785,41.546) 73.923,41.408 73.944,41.429 cw(c74.133,41.241) 74.133,41.507 77.398,41.507 cw(c77.398,41.37) 77.495,41.467 cw(c77.398,41.37) 77.535,41.37 X1.4@77.535,40.376
VDD_CORE: C152.2 C153.2 FB15.2 U9.8 | length 4.8
  Top Layer w0.3: FB15.2@41.106,28.247 41.366,28.507 C152.2@43.027,28.507 43.034,28.507 43.034,29.036 43.63,29.632 v1(43.966,29.632)
  Bottom Layer w0.3: U9.8@43.861,30.652 43.863,30.651 43.863,29.735 v1(43.966,29.632)
VDD_IO: C160.2 C161.2 FB17.2 U9.31 | length 5.1
  Top Layer w0.3: C160.2@39.207,41.024 FB17.2@41.032,41.024 ; FB17.2@41.032,41.353 FB17.2@41.032,41.024 ; v1(41.857,39.411) 41.032,40.237 FB17.2@41.032,41.024
  Bottom Layer w0.3: v1(41.857,39.411) 41.859,39.409 41.859,38.454 U9.31@41.861,38.452
VDD_OSC: C217.2 C218.2 FB28.2 U9.37 | length 4.6
  Top Layer w0.3: C218.2@43.65,41.163 44.635,41.163 FB28.2@44.825,41.353 44.875,41.353 45.175,41.053 45.175,40.421 45.261,40.335 C217.2@45.261,40.325 45.261,40.315 44.858,39.912 44.858,39.313 v1(44.829,39.284)
  Bottom Layer w0.3: v1(44.829,39.284) 44.829,39.182 44.831,39.18 44.831,38.482 U9.37@44.861,38.452
VDD_PLL1: C156.2 C157.2 FB16.2 U9.40 | length 5.8
  Top Layer w0.3: C156.2@46.01,41.248 46.869,41.248 46.994,41.124 C157.2@46.994,41.119 FB16.2@47.983,41.119 ; v1(46.633,39.893) 46.661,39.922 46.786,39.922 FB16.2@47.983,41.119 ; FB16.2@48.248,41.334 48.033,41.119 FB16.2@47.983,41.119
  Bottom Layer w0.3: U9.40@46.361,38.452 46.361,39.581 46.633,39.853 v1(46.633,39.893)
VDD_PLL2CORE: C174.2 C180.2 FB19.2 U9.6 | length 4.4
  Top Layer w0.3: FB19.2@44.172,28.247 44.394,28.469 44.683,28.469 45.109,28.895 v1(45.109,28.946) 45.109,28.905 45.224,28.79 45.224,28.567 C180.2@45.344,28.447 45.404,28.507 C174.2@46.091,28.507
  Bottom Layer w0.3: U9.6@44.861,30.652 44.861,30.212 44.941,30.133 44.941,29.445 45.109,29.277 v1(45.109,28.946)
VDD_PLL2OSC: C197.2 C198.2 FB23.2 U9.4 | length 5.2
  Top Layer w0.3: v1(47.166,29.149) 47.166,28.306 FB23.2@47.225,28.247 47.525,28.547 48.263,28.547 48.307,28.59 C197.2@49.198,28.59
  Bottom Layer w0.3: U9.4@45.861,30.652 45.891,30.622 45.891,30.207 46.096,30.002 46.313,30.002 v1(47.166,29.149)
VDDO_1/2: C184.2 C190.2 FB20.2 U9.20 | length 4.1
  Top Layer w0.3: C184.2@36.295,33.887 37.638,33.887 37.778,33.747 v1(37.819,33.747)
  Bottom Layer w0.3: FB20.2@37.923,33.643 38.232,33.952 39.429,33.952 39.549,33.832 40.181,33.832 U9.20@40.211,33.802
VDDO_3/4: C201.2 C202.2 FB24.2 U9.25 | length 3.8
  Top Layer w0.3: C201.2@39.216,34.813 39.226,34.813 39.424,35.011 C202.2@39.832,35.011 ; FB24.2@39.673,37.176 39.444,36.947 v1(39.444,36.287) 39.922,35.809 39.922,35.167 C202.2@39.952,35.136
  Bottom Layer w0.3: v1(39.444,36.287) 39.452,36.295 40.203,36.295 U9.25@40.211,36.302
VDDO_5: C213.2 C214.2 FB27.2 U9.28 | length 3.3
  Top Layer w0.3: FB27.2@38.824,39.893 38.892,39.893 38.892,38.88 38.922,38.85 38.922,38.845 39.042,38.725 39.055,38.738 C213.2@39.851,38.738 v1(39.851,38.344)
  Bottom Layer w0.3: v1(39.851,38.344) 39.851,38.303 40.061,38.093 40.061,37.832 40.091,37.802 U9.28@40.211,37.802
VDDO_6: C164.2 C165.2 FB18.2 U9.43 | length 6.2
  Top Layer w0.3: v1(49.02,37.811) 49.02,40.264 49.535,40.779 49.535,40.789 C164.2@49.545,40.789 50.275,40.789 C165.2@50.299,40.812 51.29,40.812 FB18.2@51.471,40.993
  Bottom Layer w0.3: U9.43@48.011,37.802 48.015,37.807 49.016,37.807 v1(49.02,37.811)
VDDO_7/8: C193.2 C194.2 FB22.2 U9.46 | length 4.4
  Top Layer w0.3: v1(48.893,36.312) 48.934,36.312 48.99,36.368 49.889,36.368 50.189,36.668 FB22.2@50.189,36.718 50.002,36.905 C194.2@50.002,37.912 49.96,37.954 C193.2@49.96,38.649
  Bottom Layer w0.3: U9.46@48.011,36.302 48.016,36.307 48.888,36.307 v1(48.893,36.312)
VDDO_9/10: C205.2 C206.2 FB25.2 U9.51 | length 4.2
  Top Layer w0.3: v1(48.893,33.772) 50.162,33.772 FB25.2@50.168,33.778 49.978,33.968 C206.2@49.978,34.936 49.921,34.993 C205.2@49.921,35.669
  Bottom Layer w0.3: U9.51@48.011,33.802 48.026,33.787 48.878,33.787 v1(48.893,33.772)
VP3.3: C56.2 C57.2 C58.2 C246.2 C?.2@108.03,12.701 L6.2 R56.2 R109.2 U31.1 U31.2 U31.3 U31.15 U31.16 | length 33.5
  Top Layer w0.5: 15.5,46.592 15.52,46.572 15.52,45.969 v1(15.523,45.965) ; 17.226,74.519 17.276,74.519 17.326,74.469 17.326,74.419 17.346,74.399 v1(17.346,73.303)
  Top Layer w2: L6.2@11.593,42.552 11.593,44.465
  Layer 4 w0.5: v1(15.523,45.965) 15.523,47.365 16.605,48.446 16.605,56.446 14.739,58.312 14.739,70.369 17.346,72.975 v1(17.346,73.303)
VP3.6: C248.2 U21.4
Vsup_ADC1: C60.2 C80.2 C81.2 R80.2 R103.1 R107.2 R108.2 U18.8 U23.1 U23.2 U23.3 U23.15 U23.16 U24.1 U24.2 U24.3 U24.15 U24.16 | length 66.2
  Top Layer w0.5: v1(8.422,18.364) 8.422,16.959 9.28,16.101 9.845,16.101 9.865,16.081 C60.2@9.865,16.076 9.877,16.088 10.813,16.088 R80.2@10.825,16.1 11.966,16.1 12.125,16.259 U18.8@12.125,16.584 ; C81.2@65.959,56.985 C81.2@66.109,56.835
  Layer 3 w0.5: v1(8.422,18.364) 8.422,78.03 v1(8.71,78.319)
  other v1: 66.14,57.419
Vsup_ADC2: C70.2 C76.2 R82.2 R106.2 R110.1 U20.8 U22.1 U22.2 U22.3 U22.15 U22.16 | length 5.7
  Top Layer w0.3: R106.2@33.406,68.57 33.406,70.128 34.082,70.804 34.177,70.804 C76.2@34.427,71.054
  Layer 3 w0.3: v1(10.158,20.767) 12.723,20.767 12.823,20.867 v1(12.864,20.867)
WAKE#: P1.36 R23.1 R42.1 | length 2.9
  Top Layer w0.2: 42.351,12.268 42.086,12.532 R42.1@42.086,13.891 42.286,13.691 42.925,13.691 R23.1@43.102,13.514
pads on no net: D1.1 D1.3 D1.4 D1.6 FID1.0 FID2.0 FID3.0 FID4.0 FID5.0 FID6.0 P1.5 P1.7 P1.40 P1.41 P1.43 P1.56 P1.58 P1.CPAD T2.2 U1. U1.32 U1.43 U1.44 U4.7 U4.10 U4.15 U4.16 U4.21 U4.27 U5.7 U5.10 U5.15 U5.16 U6.1 U6.2 U8.2 U8.5 U9. U9.1 U9.2 U9.3 U9.35 U9.36 U9.44 U9.45 U9.47 U9.48 U9.49 U9.50 U9.52 U9.53 U9.54 U9.55 U9.56 U10.9 U10.10 U10.12 U10.13 U11.6 U11.8 U11.11 U12.10 U12.13 U16.8 U19.2 U19.7 U21.2 U21.7 U22.8 U23.8 U24.8 U25.6 U26.2 U26.5 U27.6 U28.6 U31.8 U32.5 U32.14 U32.15 U33.4 U33.5 U33.9 U33.14 U33.15 X1.2
copper on no net: | length 4.9
  Top Layer w0.2: 70.813,51.298 70.813,52.27 70.846,52.238 v1(72.871,52.238) 72.914,52.281 74.677,52.281 74.72,52.324
  other v1: 64.667,8.067 45.165,8.702 45.718,14.976 77.316,19.116 57.097,22.113 21.41,23.206 10.26,23.51 80.338,23.815 74.319,24.679 36.371,29.886 35.076,31.308 27.964,33.34 31.951,38.014 39.978,39.995 14.298,44.999 75.233,47.336 25.601,47.717 49.528,49.19 25.398,51.349 22.122,58.537 67.892,58.893 22.122,60.874 41.296,61.389 75.241,64.791 28.091,67.3 34.441,73.396 30.478,76.342 49.7,82.175 46.518,114.899 51.217,115.788 29.359,125.298

## Polygon pours and split planes (outlines as drawn)
5V on Top Layer "5V_L01_P070" (solid, pour order 70): 14.349,16.015 14.412,15.952 14.412,15.14 19.383,15.14 19.803,14.72 20.932,14.72 20.932,16.015 20.997,16.015 20.997,19.918 18.454,19.918 18.454,17.783 14.349,17.783
no net on Top Layer "NONET_L01_P063" (solid, pour order 63): 24.992,43.907 26.313,45.227 29.488,45.227 31.469,47.209 32.51,47.209 32.51,47.082 32.967,46.624 32.967,45.989 35.076,45.989 35.507,45.558 34.999,45.227 31.723,42.129 24.306,42.129 24.255,43.221 24.916,43.881
V2.5 on Top Layer "V2.5_L01_P074" (solid, pour order 74): 16.584,33.899 16.584,36.668 8.994,36.668 8.234,37.427 8.234,46.941 11.745,46.941 14.984,50.18 15.289,50.18 30.705,50.385 32.663,58.601 32.663,62.728 29.341,62.728 29.341,52.822 14.603,52.822 10.996,49.215 7.11,49.215 7.11,33.899
VP3.3 on Top Layer "VP3.3_L01_P066" (solid, pour order 66): 8.431,46.904 8.507,46.98 16.432,46.98 16.432,41.824 15.873,41.265 15.797,41.341 8.253,41.341 8.253,46.701 8.431,46.878
VCC_PCA on Top Layer "VCC_PCA_L01_P055" (solid, pour order 55): 81.583,24.323 86.688,24.323 86.688,23.079 86.257,22.647 86.231,22.672 81.812,22.672 81.583,22.901
no net on Top Layer "NONET_L01_P052" (solid, pour order 52): 76.706,20.996 83.158,20.996 83.158,18.507 83.107,18.456 76.706,18.456
no net on Top Layer "NONET_L01_P094" (solid, pour order 94): 31.669,93.894 38.327,93.894 38.327,91.176 36.904,91.176 36.879,91.151 36.879,87.925 31.669,87.925
no net on Top Layer "NONET_L01_P086" (solid, pour order 86): 30.351,73.167 31.52,73.167 31.52,69.662 31.291,69.434 29.513,69.434 29.513,68.545 29.056,68.087 29.005,68.138 28.091,68.138 28.091,70.831 28.446,71.186 28.446,71.999 29.132,71.999 30.326,73.193
no net on Top Layer "NONET_L01_P085" (solid, pour order 85): 28.624,76.977 28.573,76.927 28.573,74.412 28.751,74.234 30.148,74.234 30.148,73.244 30.3,73.091 31.545,73.091 31.545,76.444 31.012,76.977
no net on Top Layer "NONET_L01_P081" (solid, pour order 81): 32.002,60.213 32.053,60.264 32.053,61.966 37.743,61.966 41.68,58.029 41.68,54.549 37.133,54.549 31.647,60.036 31.774,60.036 32.002,60.264
no net on Top Layer "NONET_L01_P080" (solid, pour order 80): 34.923,60.442 34.923,59.07 35.736,58.258 35.736,55.641 32.307,55.641 31.621,56.327 31.621,60.112 31.951,60.442
no net on Top Layer "NONET_L01_P078" (solid, pour order 78): 55.04,65.192 55.142,65.09 63.117,65.09 63.117,61.153 58.952,58.664 58.952,47.996 54.329,47.996 54.329,65.192
no net on Top Layer "NONET_L01_P075" (solid, pour order 75): 35.05,65.725 43.585,65.725 43.585,63.744 42.467,62.626 42.188,62.906 38.098,62.906 36.752,64.252 34.339,64.252 33.831,64.76 33.831,65.624 34.949,65.624
no net on Top Layer "NONET_L01_P073" (solid, pour order 73): 33.729,70.373 33.831,70.475 36.269,70.475 36.854,71.059 36.854,72.482 37.768,72.482 37.971,72.685 37.971,74.183 37.844,74.31 33.755,74.31 33.729,74.285
Vsup_ADC2 on Top Layer "VSUP_ADC2_L01_P072" (solid, pour order 72): 10.808,20.263 10.808,22.397 13.373,22.397 13.399,22.372 13.399,20.263
V5.5 on Top Layer "V5.5_L01_P069" (solid, pour order 69): 16.281,22.46 17.789,22.46 17.789,23.683 17.947,23.841 19.709,23.841 19.785,23.917 22.274,23.917 22.274,30.445 22.731,30.902 25.551,30.902 25.551,27.93 25.957,27.524 28.192,27.524 28.192,22.952 27.026,21.519 17.03,21.519 17.03,21.285 15.731,21.285 15.699,21.317 15.699,22.317 16.139,22.317
no net on Top Layer "NONET_L01_P068" (solid, pour order 68): 32.713,39.944 32.713,38.674 32.815,38.573 34.466,38.573 34.466,37.76 34.085,37.379 31.333,37.887 30.87,39.944
no net on Top Layer "NONET_L01_P067" (solid, pour order 67): 32.713,39.69 31.443,39.69 31.443,41.951 32.815,43.322 33.628,43.322 34.085,43.78 34.085,44.491 36.117,44.491 36.422,44.796 36.447,44.77 37.463,44.77 37.463,43.246 36.65,42.433 36.219,42.433 36.219,41.824 35.279,40.884 32.993,40.884 32.688,40.579 32.688,39.665
no net on Top Layer "NONET_L01_P065" (solid, pour order 65): 32.434,62.728 35.152,62.728 35.152,61.991 35.177,61.966 34.923,61.712 32.434,61.712
no net on Top Layer "NONET_L01_P062" (solid, pour order 62): 42.011,44.96 41.713,45.761 50.417,45.761 50.417,42.357 49.731,41.671 46.887,41.671 46.887,41.951 45.642,43.195 45.794,43.348 45.794,44.11 44.728,44.11 43.051,44.821
no net on Top Layer "NONET_L01_P061" (solid, pour order 61): 61.695,55.972 61.746,55.921 65.378,55.921 65.378,58.969 65.352,58.943 64.387,58.943 64.387,60.493 63.676,61.204 61.111,61.204 61.111,60.772 60.018,59.68 60.018,56.607 60.73,55.895 61.695,55.895
no net on Top Layer "NONET_L01_P060" (solid, pour order 60): 42.975,61.56 42.924,61.509 42.924,48.707 43.813,47.818 46.836,47.818 46.836,61.661 46.683,61.814 42.975,61.814
no net on Top Layer "NONET_L01_P058" (solid, pour order 58): 31.276,50.943 33.922,50.943 33.922,50.274 34.75,50.274 34.75,49.263 34.61,49.124 34.61,48.151 32.939,48.151 32.71,47.922 32.71,47.17 31.574,47.17 30.681,47.162 30.681,50.271 31.326,50.916
no net on Top Layer "NONET_L01_P057" (solid, pour order 57): 65.251,58.715 65.276,58.689 65.276,57.724 65.352,57.724 65.429,57.648 65.429,55.895 67.536,55.895 ccw(c67.536,57.37) 68.578,56.327 ccw(c68.026,56.879) 68.807,56.879 68.807,57.521 cw(c68.93,57.644) 68.756,57.644 68.756,57.826 cw(c69.185,57.397) 69.185,58.004 69.402,58.004 ccw(c69.402,58.958) 70.077,58.283 cw(c70.138,58.344) 70.051,58.344 70.051,60.798 ccw(c69.5,60.246) 69.5,61.026 69.467,61.026 ccw(c69.467,60.229) 68.904,60.793 68.807,60.696 cw(c68.255,61.248) 68.255,60.467 66.622,60.467 ccw(c67.052,60.038) 66.445,60.038 66.445,59.267 cw(c65.664,59.267) 66.216,58.715
no net on Top Layer "NONET_L01_P101" (solid, pour order 101): 66.241,22.418 66.216,22.393 66.216,16.957 68.781,16.957 69.137,17.313 69.137,22.139 68.832,22.444 66.191,22.444
no net on Top Layer "NONET_L01_P100" (solid, pour order 100): 45.363,45.05 45.413,45.1 46.887,45.1 46.887,44.618 46.963,44.542 50.595,44.542 50.595,41.494 47.522,41.494 45.591,41.646 45.591,42.56 45.591,43.932 45.337,44.186 45.337,45.05
no net on Top Layer "NONET_L01_P088" (solid, pour order 88): 78.408,38.319 78.433,38.344 80.084,38.344 80.084,42.052 80.288,42.256 84.58,42.256 84.58,38.598 82.599,36.617 78.2,36.617
no net on Top Layer "NONET_L01_P082" (solid, pour order 82): 41.349,58.435 42.492,58.435 42.492,56.378 42.492,54.092 41.807,54.092 41.807,55.184 41.4,55.591 41.095,55.591 41.095,58.156 41.324,58.385
4610_FINE_V on Top Layer "4610_FINE_V_L01_P077" (solid, pour order 77): 40.511,27.498 49.477,27.498 49.477,25.898 48.893,25.314 41.019,25.314 40.46,25.873 40.46,27.549
no net on Bottom Layer "NONET_L06_P095" (solid, pour order 95): 48.792,51.247 50.112,51.247 cw(c50.112,50.722) 50.637,50.722 50.637,48.521 cw(c50.214,48.521) 50.214,48.098 48.766,48.098 cw(c48.766,48.428) 48.436,48.428 48.436,50.942 cw(c48.766,50.942) 48.766,51.273
no net on Bottom Layer "NONET_L06_P087" (solid, pour order 87): 52.328,50.968 52.302,50.942 52.302,47.742 61.593,47.742 67.486,53.635 67.486,64.227 56.747,64.227 56.468,64.506 56.316,64.354 53.318,64.354 53.318,60.645 51.871,59.197 51.871,50.942
no net on Bottom Layer "NONET_L06_P084" (solid, pour order 84): 52.881,59.121 52.144,59.121 51.941,59.324 52.322,59.705 52.322,60.569 52.678,60.569 53.237,61.128 53.237,61.458 53.491,61.458 54.583,62.22 54.684,61.026 53.643,59.985 52.932,59.985 52.932,59.274 52.754,59.096
no net on Bottom Layer "NONET_L06_P083" (solid, pour order 83): 48.969,61.61 48.868,61.509 48.868,59.02 50.874,59.02 50.925,59.07 50.9,59.096 50.9,60.213 51.535,60.848 51.535,61.585 49.02,61.585 48.995,61.61
no net on Bottom Layer "NONET_L06_P079" (solid, pour order 79): 42.924,61.197 42.924,48.707 43.813,47.818 46.836,47.818 46.836,61.197
AGND on Bottom Layer "AGND_L06_P099" (solid, pour order 99): 164.201,17.837 189.148,17.837 189.148,12.3 200.348,12.3 200.348,14.95 cw(c201.298,14.95) 202.248,14.95 202.248,12.5 223.448,12.5 223.448,17.837 244.913,17.837 244.913,145.345 164.201,145.345
no net on Bottom Layer "NONET_L06_P054" (solid, pour order 54): 80.516,41.519 83.894,41.519 83.894,38.827 83.183,38.115 80.415,38.115 80.415,41.392 80.516,41.494
no net on Bottom Layer "NONET_L06_P053" (solid, pour order 53): 66.267,22.469 66.241,22.444 66.241,17.008 68.807,17.008 69.162,17.364 69.162,22.19 68.858,22.494 66.216,22.494
AGND on Layer 4 "AGND_L04_P092" (solid, pour order 92): 164.201,17.837 179.311,17.837 189.648,7.5 199.848,7.5 200.348,8 200.348,14.95 cw(c201.298,14.95) 202.248,14.95 202.248,8 202.748,7.5 222.948,7.5 233.285,17.837 244.913,17.837 244.913,145.345 164.201,145.345
no net on Layer 4 "NONET_L04_P089" (solid, pour order 89): 45.715,11.207 45.614,7.779 44.551,7.779 44.351,10.099 42.391,10.099 42.391,7.712 42.391,7.331 37.158,7.331 37.158,10.963 37.514,11.318
no net on Layer 4 "NONET_L04_P076" (solid, pour order 76): 46.404,49.723 50.29,49.723 50.29,48.377 50.316,48.352 46.429,48.352
AGND on Layer 3 "AGND_L03_P091" (solid, pour order 91): 164.201,17.837 189.148,17.837 189.148,12.8 200.348,12.8 200.348,14.95 cw(c201.298,14.95) 202.248,14.95 202.248,8 202.748,7.5 222.948,7.5 223.448,8 223.448,17.837 244.913,17.837 244.913,145.345 164.201,145.345
no net on Layer 3 "Layer 3-No Net" (solid, pour order 96): 83.234,57.851
no net on Layer 5 (AGND) "Layer 5 (AGND)-No Net" (solid, pour order 103): 49.698,60.01 49.728,59.98 87.069,59.98

## Dimensions
130.55,0.05 to 100.5,4.15 on Top Layer
110.7,0.05 to 0,4.15 on Top Layer
0,148 to 100.5,148 on Top Layer
60.038,0 to 100.5,148 on Top Layer
100.5,4.15 to 100.5,148 on Top Layer
40.075,0.05 to 59.925,0.05 on Bottom Layer

## Text inside footprints (layer, text, board x,y; h text height)
P1: Top Overlay "M" at 115.094,3.011 h0.5